# Altium PCB ESP32_EC.PcbDoc (part 2 of 2)
Units mil, origin at the board's own origin, x right, y up, seen from the top; angles counter-clockwise.
Board outline 2362.2 x 3110.24 mil, 2 copper layers (Top Layer, Bottom Layer), stack 61.756 mil thick; 57 components, 42 nets, 194 pads, 226 vias.
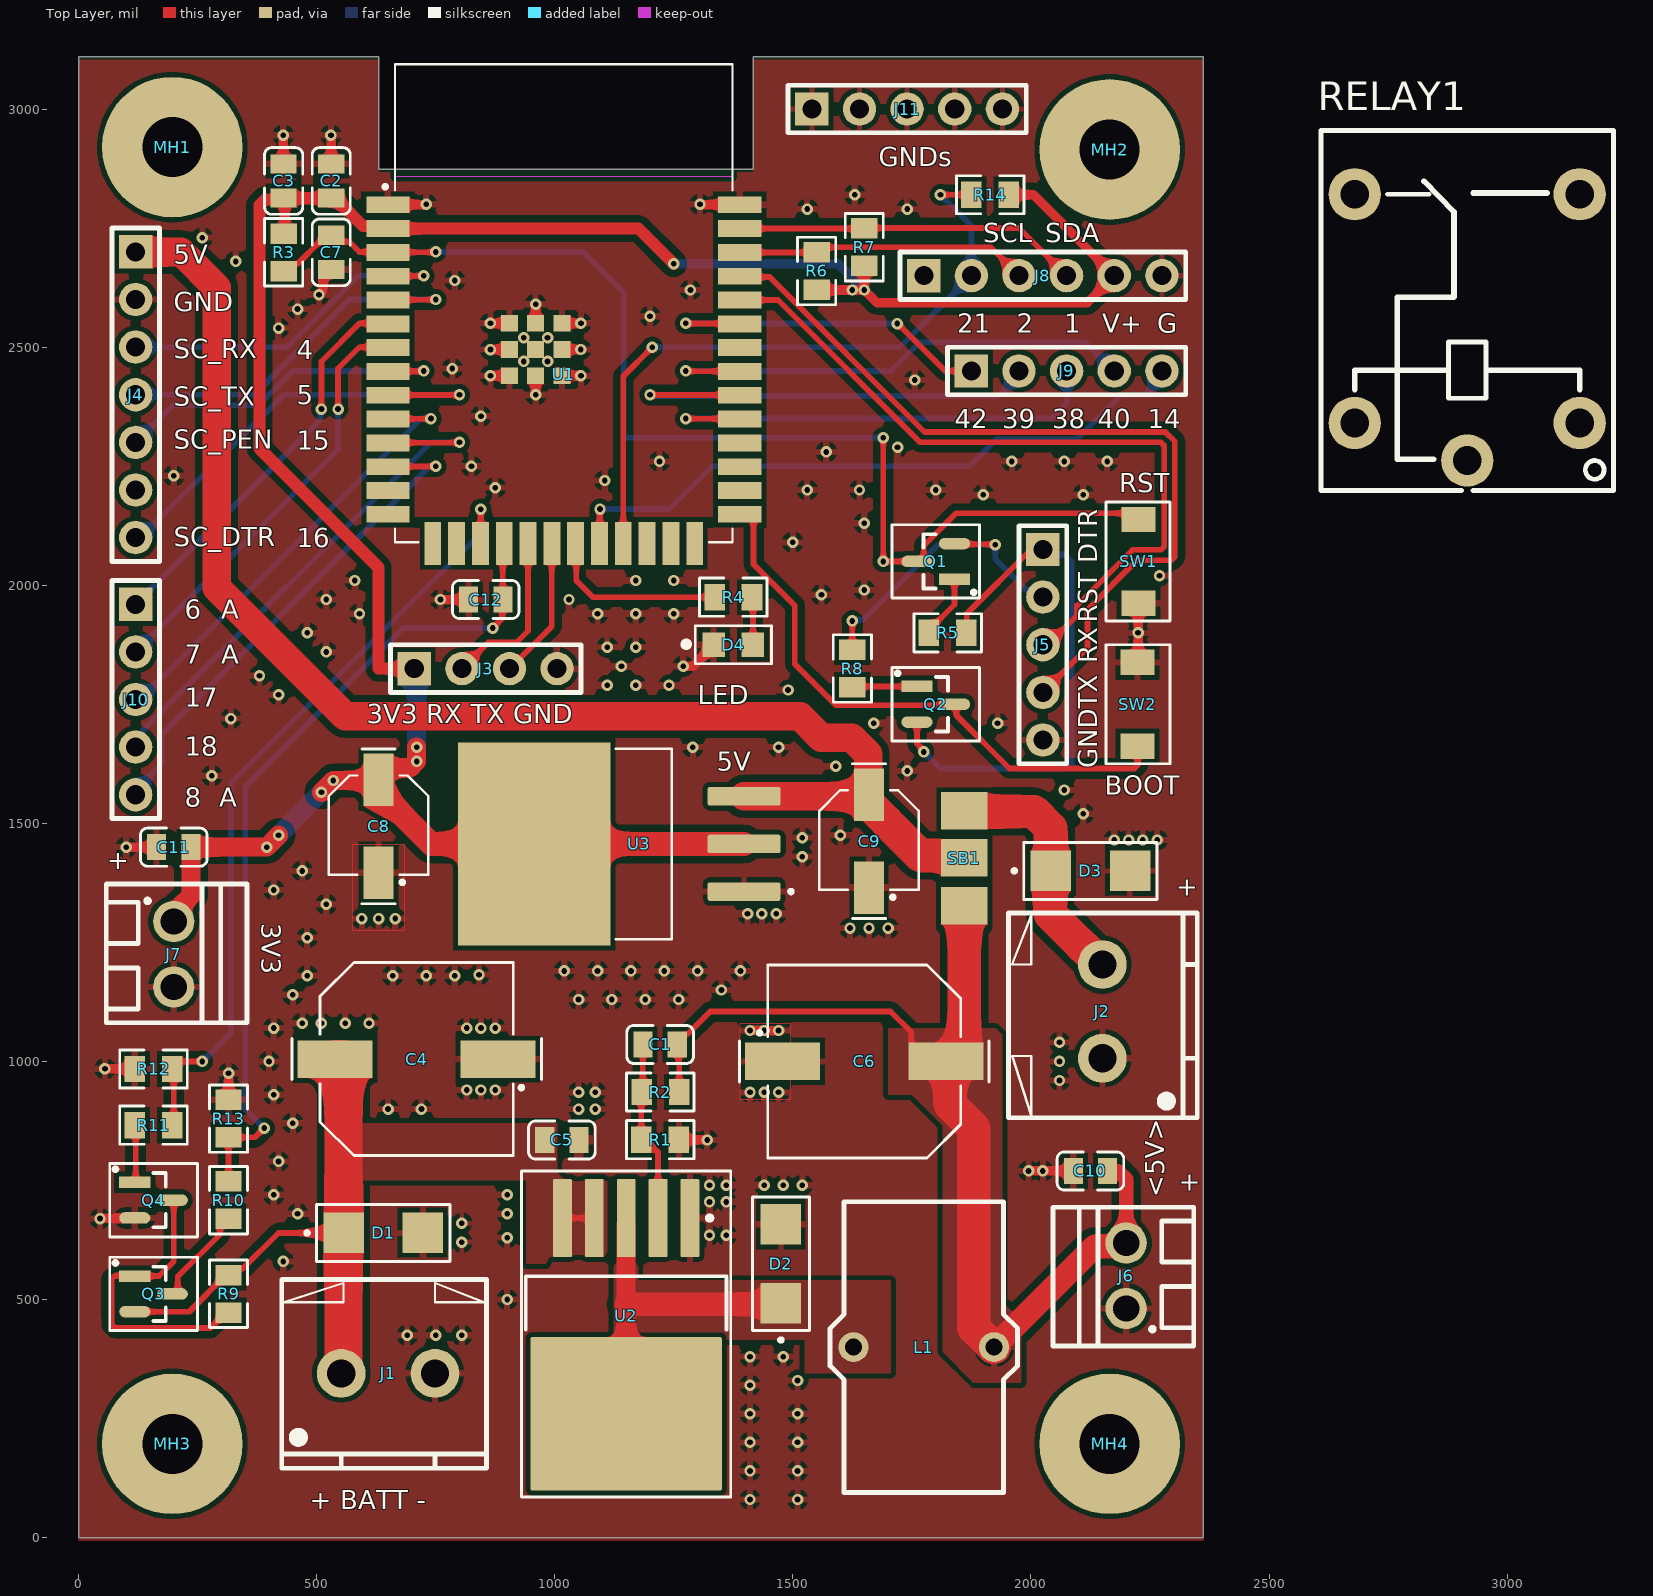
[diagram p0: Top Layer view]

## Part data (continued)
R6 R7 R14: library part RC0805FR-074K7L, "4.7 kOhms ±1% 0.125W, 1/8W Chip Resistor 0805 (2012 Metric) Moisture Resistant Thick Film", Case Code (Imperial)=0805, LCSC Part Number=C17673, Manufacturer="Yageo Group", Max Operating Temperature=155°C, Max Power Dissipation=125mW, Min Operating Temperature=-55°C, Supplier Part Number=311-4.70KCRCT-ND, Temperature Coefficient=100ppm/°C, Tolerance=1%, Voltage Rating=150V, Case/Package=0805, Category="Chip SMD Resistors", China RoHS=Non-Compliant, ComponentLink1Description=https://datasheet.octopart.com:443/RC0805FR-074K7L-Yageo-datasheet-175887523.pdf?src-supplier=IHS, ComponentLink1URL=https://datasheet.octopart.com:443/RC0805FR-074K7L-Yageo-datasheet-175887523.pdf?src-supplier=IHS, ComponentLink2Description=https://datasheet.octopart.com:443/RC0805FR-074K7L-Yageo-datasheet-103092701.pdf?src-supplier=Upverter, ComponentLink2URL=https://datasheet.octopart.com:443/RC0805FR-074K7L-Yageo-datasheet-103092701.pdf?src-supplier=Upverter, ComponentLink3Description=https://datasheet.octopart.com:443/RC0805FR-074K7L-Yageo-datasheet-98239111.pdf?src-supplier=Upverter, ComponentLink3URL=https://datasheet.octopart.com:443/RC0805FR-074K7L-Yageo-datasheet-98239111.pdf?src-supplier=Upverter, ComponentLink4Description=https://datasheet.octopart.com:443/RC0805FR-074K7L-Yageo-datasheet-45841575.pdf?src-supplier=Upverter, ComponentLink4URL=https://datasheet.octopart.com:443/RC0805FR-074K7L-Yageo-datasheet-45841575.pdf?src-supplier=Upverter, ComponentLink5Description=https://datasheet.octopart.com:443/RC0805FR-074K7L-Yageo-datasheet-8330313.pdf?src-supplier=Newark, ComponentLink5URL=https://datasheet.octopart.com:443/RC0805FR-074K7L-Yageo-datasheet-8330313.pdf?src-supplier=Newark, ComponentLink6Description=https://datasheet.octopart.com:443/RC0805FR-074K7L-Yageo-datasheet-12592811.pdf?src-supplier=element14+APAC, ComponentLink6URL=https://datasheet.octopart.com:443/RC0805FR-074K7L-Yageo-datasheet-12592811.pdf?src-supplier=element14+APAC, ComponentLink7Description=https://datasheet.octopart.com:443/RC0805FR-074K7L-Yageo-datasheet-62067350.pdf?src-supplier=element14+APAC, ComponentLink7URL=https://datasheet.octopart.com:443/RC0805FR-074K7L-Yageo-datasheet-62067350.pdf?src-supplier=element14+APAC, ComponentLink8Description=https://datasheet.octopart.com:443/RC0805FR-074K7L-Yageo-datasheet-164759695.pdf?src-supplier=Future+Electronics, ComponentLink8URL=https://datasheet.octopart.com:443/RC0805FR-074K7L-Yageo-datasheet-164759695.pdf?src-supplier=Future+Electronics, ComponentLink9Description=https://datasheet.octopart.com:443/RC0805FR-074K7L-Yageo-datasheet-8324252.pdf?src-supplier=Future+Electronics, ComponentLink9URL=https://datasheet.octopart.com:443/RC0805FR-074K7L-Yageo-datasheet-8324252.pdf?src-supplier=Future+Electronics, ComponentLink10Description=https://datasheet.octopart.com/RC0805FR-074K7L-Yageo-datasheet-73766026.pdf, ComponentLink10URL=https://datasheet.octopart.com/RC0805FR-074K7L-Yageo-datasheet-73766026.pdf, ComponentLink11Description=https://datasheet.octopart.com:443/RC0805FR-074K7L-Yageo-datasheet-13691069.pdf?src-supplier=Farnell, ComponentLink11URL=https://datasheet.octopart.com:443/RC0805FR-074K7L-Yageo-datasheet-13691069.pdf?src-supplier=Farnell, ComponentLink12Description=https://datasheet.octopart.com:443/RC0805FR-074K7L-Yageo-datasheet-118657.pdf?src-supplier=DigiKey, ComponentLink12URL=https://datasheet.octopart.com:443/RC0805FR-074K7L-Yageo-datasheet-118657.pdf?src-supplier=DigiKey, ComponentLink13Description=http://sigma.octopart.com:80/conflict_mineral_statement/Yageo-company-3.pdf?src-supplier=Compliance+Statements, ComponentLink13URL=http://sigma.octopart.com:80/conflict_mineral_statement/Yageo-company-3.pdf?src-supplier=Compliance+Statements, ComponentLink14Description=http://sigma.octopart.com:80/rohs_statement/Yageo-company-2.pdf?src-supplier=Compliance+Statements, ComponentLink14URL=http://sigma.octopart.com:80/rohs_statement/Yageo-company-2.pdf?src-supplier=Compliance+Statements, Composition="Thick Film", Depth=1.25mm, Features="Moisture Resistant", Height=500µm, Lead Free="Lead Free", Lifecycle Status=Production, Manufacturer Part Number=RC0805FR-074K7L, Military Standard=Not, Mounting Technology="Surface Mount", Number of Terminals=2, Number of Terminations=2, Packaging="Tape and Reel", Pins=2, Power Dissipation=125mW, Power Rating=125mW, Pricing="1=0.1, 10=0.03, 25=0.0224, 50=0.018, 100=0.0147, 250=0.01152, 500=0.00972, 1000=0.00829 (USD)", REACH SVHC=Yes, RoHS=Compliant, Schedule B="8533210045, 8533210045|8533210045|8533210045|8533210045|8533210045|8533210045|8533210045|8533210045|8533210045|8533210045|8533210045|8533210045|8533210045, 8533210045|8533210045|8533210045|8533210045|8533210045|8533210045|8533210045|8533210045|8533210045|8533210045|8533210045|8533210045|8533210045|8533210045, 8533210045|8533210045|8533210045|8533210045|8533210045|8533210045|8533210045|8533210045|8533210045|8533210045|8533210045|8533210045|8533210045|8533210045|8533210045", Stock=89581, Supplier=DigiKey, Termination=SMD/SMT, Voltage Rating (AC)=150V, Voltage Rating (DC)=150V, Width=1.25mm, Working Voltage=150V
R9 R10 R12: library part RC0805FR-07100KL, "100K OHM 1% 1/8W 0805", Case Code (Imperial)=0805, LCSC Part Number=C96346, Manufacturer="Yageo Group", Max Operating Temperature=155°C, Max Power Dissipation=125mW, Min Operating Temperature=-55°C, Supplier Part Number=311-100KCRCT-ND, Temperature Coefficient=100ppm/°C, Tolerance=1%, Voltage Rating=150V, Case/Package=0805, Category="Chip SMD Resistors", China RoHS=Non-Compliant, ComponentLink1Description=https://datasheet.octopart.com:443/RC0805FR-07100KL-Yageo-datasheet-175887523.pdf?src-supplier=IHS, ComponentLink1URL=https://datasheet.octopart.com:443/RC0805FR-07100KL-Yageo-datasheet-175887523.pdf?src-supplier=IHS, ComponentLink2Description=https://datasheet.octopart.com:443/RC0805FR-07100KL-Yageo-datasheet-164759695.pdf?src-supplier=Upverter, ComponentLink2URL=https://datasheet.octopart.com:443/RC0805FR-07100KL-Yageo-datasheet-164759695.pdf?src-supplier=Upverter, ComponentLink3Description=https://datasheet.octopart.com:443/RC0805FR-07100KL-Yageo-datasheet-103092701.pdf?src-supplier=Upverter, ComponentLink3URL=https://datasheet.octopart.com:443/RC0805FR-07100KL-Yageo-datasheet-103092701.pdf?src-supplier=Upverter, ComponentLink4Description=https://sigma.octopart.com:443/138820526/technical_drawing/Yageo-RC0805FR-07100KL.pdf?src-supplier=Upverter, ComponentLink4URL=https://sigma.octopart.com:443/138820526/technical_drawing/Yageo-RC0805FR-07100KL.pdf?src-supplier=Upverter, ComponentLink5Description=https://datasheet.octopart.com:443/RC0805FR-07100KL-Yageo-datasheet-118657.pdf?src-supplier=DigiKey, ComponentLink5URL=https://datasheet.octopart.com:443/RC0805FR-07100KL-Yageo-datasheet-118657.pdf?src-supplier=DigiKey, ComponentLink6Description=https://datasheet.octopart.com:443/RC0805FR-07100KL-Yageo-datasheet-8330313.pdf?src-supplier=element14+APAC, ComponentLink6URL=https://datasheet.octopart.com:443/RC0805FR-07100KL-Yageo-datasheet-8330313.pdf?src-supplier=element14+APAC, ComponentLink7Description=https://datasheet.octopart.com:443/RC0805FR-07100KL-Yageo-datasheet-12592811.pdf?src-supplier=element14+APAC, ComponentLink7URL=https://datasheet.octopart.com:443/RC0805FR-07100KL-Yageo-datasheet-12592811.pdf?src-supplier=element14+APAC, ComponentLink8Description=https://datasheet.octopart.com:443/RC0805FR-07100KL-Yageo-datasheet-62067350.pdf?src-supplier=Farnell, ComponentLink8URL=https://datasheet.octopart.com:443/RC0805FR-07100KL-Yageo-datasheet-62067350.pdf?src-supplier=Farnell, ComponentLink9Description=https://datasheet.octopart.com:443/RC0805FR-07100KL-Yageo-datasheet-13691069.pdf?src-supplier=Farnell, ComponentLink9URL=https://datasheet.octopart.com:443/RC0805FR-07100KL-Yageo-datasheet-13691069.pdf?src-supplier=Farnell, ComponentLink10Description=https://datasheet.octopart.com:443/RC0805FR-07100KL-Yageo-datasheet-127823281.pdf?src-supplier=Future+Electronics, ComponentLink10URL=https://datasheet.octopart.com:443/RC0805FR-07100KL-Yageo-datasheet-127823281.pdf?src-supplier=Future+Electronics, ComponentLink11Description=https://datasheet.octopart.com:443/RC0805FR-07100KL-Yageo-datasheet-137700087.pdf?src-supplier=Future+Electronics, ComponentLink11URL=https://datasheet.octopart.com:443/RC0805FR-07100KL-Yageo-datasheet-137700087.pdf?src-supplier=Future+Electronics, ComponentLink12Description=https://datasheet.octopart.com:443/RC0805FR-07100KL-Yageo-datasheet-77992522.pdf?src-supplier=Future+Electronics, ComponentLink12URL=https://datasheet.octopart.com:443/RC0805FR-07100KL-Yageo-datasheet-77992522.pdf?src-supplier=Future+Electronics, ComponentLink13Description=https://datasheet.octopart.com:443/RC0805FR-07100KL-Yageo-datasheet-80324437.pdf?src-supplier=Future+Electronics, ComponentLink13URL=https://datasheet.octopart.com:443/RC0805FR-07100KL-Yageo-datasheet-80324437.pdf?src-supplier=Future+Electronics, ComponentLink14Description=https://datasheet.octopart.com:443/RC0805FR-07100KL-Yageo-datasheet-67302840.pdf?src-supplier=Future+Electronics, ComponentLink14URL=https://datasheet.octopart.com:443/RC0805FR-07100KL-Yageo-datasheet-67302840.pdf?src-supplier=Future+Electronics, ComponentLink15Description=https://datasheet.octopart.com:443/RC0805FR-07100KL-Yageo-datasheet-8324252.pdf?src-supplier=Future+Electronics, ComponentLink15URL=https://datasheet.octopart.com:443/RC0805FR-07100KL-Yageo-datasheet-8324252.pdf?src-supplier=Future+Electronics, ComponentLink16Description=https://datasheet.octopart.com:443/RC0805FR-07100KL-Yageo-datasheet-79472498.pdf?src-supplier=Megastar, ComponentLink16URL=https://datasheet.octopart.com:443/RC0805FR-07100KL-Yageo-datasheet-79472498.pdf?src-supplier=Megastar, ComponentLink17Description=https://datasheet.octopart.com:443/RC0805FR-07100KL-Yageo-datasheet-27714392.pdf?src-supplier=Seeed+Studio, ComponentLink17URL=https://datasheet.octopart.com:443/RC0805FR-07100KL-Yageo-datasheet-27714392.pdf?src-supplier=Seeed+Studio, ComponentLink18Description=https://datasheet.octopart.com/RC0805FR-07100KL-Yageo-datasheet-73766026.pdf, ComponentLink18URL=https://datasheet.octopart.com/RC0805FR-07100KL-Yageo-datasheet-73766026.pdf, ComponentLink19Description=https://datasheet.octopart.com:443/RC0805FR-07100KL-Yageo-datasheet-502840.pdf?src-supplier=element14, ComponentLink19URL=https://datasheet.octopart.com:443/RC0805FR-07100KL-Yageo-datasheet-502840.pdf?src-supplier=element14, ComponentLink20Description=http://sigma.octopart.com:80/conflict_mineral_statement/Yageo-company-3.pdf?src-supplier=Compliance+Statements, ComponentLink20URL=http://sigma.octopart.com:80/conflict_mineral_statement/Yageo-company-3.pdf?src-supplier=Compliance+Statements, ComponentLink21Description=http://sigma.octopart.com:80/rohs_statement/Yageo-company-2.pdf?src-supplier=Compliance+Statements, ComponentLink21URL=http://sigma.octopart.com:80/rohs_statement/Yageo-company-2.pdf?src-supplier=Compliance+Statements, Composition="Thick Film", Depth=1.25mm, Features="Moisture Resistant", Height=500µm, Lead Free="Lead Free", Lead Pitch=400µm, Length=2mm, Lifecycle Status=Production, Manufacturer Part Number=RC0805FR-07100KL, Military Standard=Not, Mounting Technology="Surface Mount", Number of Terminals=2, Number of Terminations=2, Packaging="Tape & Reel", Pins=2, Power Dissipation=125mW, Power Rating=125mW, Pricing="1=0.1, 10=0.03, 25=0.0224, 50=0.018, 100=0.0147, 250=0.01152, 500=0.00972, 1000=0.00829 (USD)", REACH SVHC=Yes, RoHS=Compliant, Schedule B="8533210045, 8533210045|8533210045, 8533210045|8533210045|8533210045, 8533210045|8533210045|8533210045|8533210045", Stock=934885, Supplier=DigiKey, Termination=SMD/SMT, Voltage Rating (AC)=150V, Voltage Rating (DC)=150V, Width=1.25mm, Working Voltage=150V
R13: library part RC0805FR-0747KL, "RES 47K OHM 1% 1/8W 0805", Case Code (Imperial)=0805, LCSC Part Number=C105579, Manufacturer="Yageo Group", Max Operating Temperature=155°C, Min Operating Temperature=-55°C, Power Dissipation=125mW, Supplier Part Number=311-47.0KCRCT-ND, Temperature Coefficient=100ppm/°C, Tolerance=1%, Voltage Rating=150V, Case/Package=0805, Category="Chip SMD Resistors", China RoHS=Non-Compliant, ComponentLink1Description=https://datasheet.octopart.com:443/RC0805FR-0747KL-Yageo-datasheet-175887523.pdf?src-supplier=IHS, ComponentLink1URL=https://datasheet.octopart.com:443/RC0805FR-0747KL-Yageo-datasheet-175887523.pdf?src-supplier=IHS, ComponentLink2Description=https://datasheet.octopart.com:443/RC0805FR-0747KL-Yageo-datasheet-62067350.pdf?src-supplier=element14+APAC, ComponentLink2URL=https://datasheet.octopart.com:443/RC0805FR-0747KL-Yageo-datasheet-62067350.pdf?src-supplier=element14+APAC, ComponentLink3Description=https://datasheet.octopart.com:443/RC0805FR-0747KL-Yageo-datasheet-8330313.pdf?src-supplier=element14+APAC, ComponentLink3URL=https://datasheet.octopart.com:443/RC0805FR-0747KL-Yageo-datasheet-8330313.pdf?src-supplier=element14+APAC, ComponentLink4Description=https://datasheet.octopart.com:443/RC0805FR-0747KL-Yageo-datasheet-103092701.pdf?src-supplier=Upverter, ComponentLink4URL=https://datasheet.octopart.com:443/RC0805FR-0747KL-Yageo-datasheet-103092701.pdf?src-supplier=Upverter, ComponentLink5Description=https://datasheet.octopart.com:443/RC0805FR-0747KL-Yageo-datasheet-98239111.pdf?src-supplier=Upverter, ComponentLink5URL=https://datasheet.octopart.com:443/RC0805FR-0747KL-Yageo-datasheet-98239111.pdf?src-supplier=Upverter, ComponentLink6Description=https://datasheet.octopart.com:443/RC0805FR-0747KL-Yageo-Group-datasheet-176638170.pdf?src-supplier=Future+Electronics, ComponentLink6URL=https://datasheet.octopart.com:443/RC0805FR-0747KL-Yageo-Group-datasheet-176638170.pdf?src-supplier=Future+Electronics, ComponentLink7Description=https://datasheet.octopart.com:443/RC0805FR-0747KL-Yageo-datasheet-164759695.pdf?src-supplier=Future+Electronics, ComponentLink7URL=https://datasheet.octopart.com:443/RC0805FR-0747KL-Yageo-datasheet-164759695.pdf?src-supplier=Future+Electronics, ComponentLink8Description=https://datasheet.octopart.com:443/RC0805FR-0747KL-Yageo-datasheet-12592811.pdf?src-supplier=Future+Electronics, ComponentLink8URL=https://datasheet.octopart.com:443/RC0805FR-0747KL-Yageo-datasheet-12592811.pdf?src-supplier=Future+Electronics, ComponentLink9Description=https://datasheet.octopart.com:443/RC0805FR-0747KL-Yageo-datasheet-8324252.pdf?src-supplier=Future+Electronics, ComponentLink9URL=https://datasheet.octopart.com:443/RC0805FR-0747KL-Yageo-datasheet-8324252.pdf?src-supplier=Future+Electronics, ComponentLink10Description=https://datasheet.octopart.com:443/RC0805FR-0747KL-Yageo-datasheet-79472498.pdf?src-supplier=Megastar, ComponentLink10URL=https://datasheet.octopart.com:443/RC0805FR-0747KL-Yageo-datasheet-79472498.pdf?src-supplier=Megastar, ComponentLink11Description=https://datasheet.octopart.com:443/RC0805FR-0747KL-Yageo-datasheet-27714392.pdf?src-supplier=Seeed+Studio, ComponentLink11URL=https://datasheet.octopart.com:443/RC0805FR-0747KL-Yageo-datasheet-27714392.pdf?src-supplier=Seeed+Studio, ComponentLink12Description=https://datasheet.octopart.com/RC0805FR-0747KL-Yageo-datasheet-73766026.pdf, ComponentLink12URL=https://datasheet.octopart.com/RC0805FR-0747KL-Yageo-datasheet-73766026.pdf, ComponentLink13Description=https://datasheet.octopart.com:443/RC0805FR-0747KL-Yageo-datasheet-13691069.pdf?src-supplier=Farnell, ComponentLink13URL=https://datasheet.octopart.com:443/RC0805FR-0747KL-Yageo-datasheet-13691069.pdf?src-supplier=Farnell, ComponentLink14Description=https://datasheet.octopart.com:443/RC0805FR-0747KL-Yageo-datasheet-118657.pdf?src-supplier=DigiKey, ComponentLink14URL=https://datasheet.octopart.com:443/RC0805FR-0747KL-Yageo-datasheet-118657.pdf?src-supplier=DigiKey, ComponentLink15Description=https://datasheet.octopart.com:443/RC0805FR-0747KL-Yageo-datasheet-502840.pdf?src-supplier=element14, ComponentLink15URL=https://datasheet.octopart.com:443/RC0805FR-0747KL-Yageo-datasheet-502840.pdf?src-supplier=element14, ComponentLink16Description=http://sigma.octopart.com:80/conflict_mineral_statement/Yageo-company-3.pdf?src-supplier=Compliance+Statements, ComponentLink16URL=http://sigma.octopart.com:80/conflict_mineral_statement/Yageo-company-3.pdf?src-supplier=Compliance+Statements, ComponentLink17Description=http://sigma.octopart.com:80/rohs_statement/Yageo-company-2.pdf?src-supplier=Compliance+Statements, ComponentLink17URL=http://sigma.octopart.com:80/rohs_statement/Yageo-company-2.pdf?src-supplier=Compliance+Statements, Composition="Thick Film", Contact Plating=Tin, Depth=1.25mm, Height=500µm, Lead Free="Lead Free", Length=2mm, Lifecycle Status=Production, Manufacturer Part Number=RC0805FR-0747KL, Mounting Technology="Surface Mount", Number of Terminals=2, Number of Terminations=2, Packaging="Tape and Reel", Pins=2, Power Rating=125mW, Pricing="1=0.1, 10=0.009, 25=0.0088, 50=0.0082, 100=0.0071 (USD)", Radiation Hardening=No, REACH SVHC=Yes, RoHS=Compliant, Schedule B="8533210045, 8533210045|8533210045, 8533210045|8533210045|8533210045, 8533210045|8533210045|8533210045|8533210045", Stock=191777, Supplier=DigiKey, Termination=SMD/SMT, Voltage Rating (AC)=150V, Voltage Rating (DC)=150V, Width=1.25mm, Working Voltage=150V
RELAY1: "12V_Relay"
SW1 SW2: library part TS-1088-AR02016, "Without 50mA 4mm 100MΩ 100000 Times 12V 160gf 3mm 2mm Round Button Standing paste SPST SMD Tactile Switches ROHS", LCSC Part Number=C720477
U2: library part XL4005E1, "XL4005E1-5V-5A-BUCK / 300KHz", Package=TO-263-5L
U3: "IC REG LINEAR 3.3V 5A TO263", Case/Package=TO-263, Current Rating=5A, Dropout Voltage=1.3V, Manufacturer="Texas Instruments", Manufacturer Lifecycle Status=ACTIVE, Max Operating Temperature=125°C, Max Power Dissipation=30W, Max Supply Voltage=27V, Min Current Limit=5.5A, Min Input Voltage=2.6V, Min Operating Temperature=-40°C, Nominal Output Voltage=3.3V, Quiescent Current=10mA, Category="LDO Voltage Regulators", ComponentLink1Description=https://datasheet.octopart.com:443/LM1084IS-3.3-NOPB-Texas-Instruments-datasheet-36834603.pdf?src-supplier=Farnell, ComponentLink1URL=https://datasheet.octopart.com:443/LM1084IS-3.3-NOPB-Texas-Instruments-datasheet-36834603.pdf?src-supplier=Farnell, ComponentLink2Description=https://octopart.com:443/opatz8j6/c1?t=w6vwqWfNppgvDygbXveTbClDM0ZnxyhdCHGzur0Nm6VEadmthkQzndR7s3Ajz8MLEFRhQ3UDka_f8COcniNFxrzJWTGIO3bk5hs1S7SsHSpYp2xDlcf4aJYdkGqn7GyG9QFfRscTRC8MpRePZIQmcWcJsyAVqzxwKd2qe9HT6rqpAEiSzx3lhvhiiMLhKmG65SlrnGiZ_vRKX3RdqzDDq8IML42iScMdYb8bI4AVealvVNZHUd0B-HvSGOc2NH6MwpAeGLWrFv1pDJgD9Da9zcNFi_yt1wulgeQkiDTOtaJ6DfIQVm6L8XiNZEVLJe4lirfj9lBNRZZMY79DqDQz1ZUurfLBoxnm0SzQwy_iUXY3z08JEKkfSBOK9XhfN4xy4gbj&src-supplier=Texas+Instruments, ComponentLink2URL=https://octopart.com:443/opatz8j6/c1?t=w6vwqWfNppgvDygbXveTbClDM0ZnxyhdCHGzur0Nm6VEadmthkQzndR7s3Ajz8MLEFRhQ3UDka_f8COcniNFxrzJWTGIO3bk5hs1S7SsHSpYp2xDlcf4aJYdkGqn7GyG9QFfRscTRC8MpRePZIQmcWcJsyAVqzxwKd2qe9HT6rqpAEiSzx3lhvhiiMLhKmG65SlrnGiZ_vRKX3RdqzDDq8IML42iScMdYb8bI4AVealvVNZHUd0B-HvSGOc2NH6MwpAeGLWrFv1pDJgD9Da9zcNFi_yt1wulgeQkiDTOtaJ6DfIQVm6L8XiNZEVLJe4lirfj9lBNRZZMY79DqDQz1ZUurfLBoxnm0SzQwy_iUXY3z08JEKkfSBOK9XhfN4xy4gbj&src-supplier=Texas+Instruments, ComponentLink3Description=https://sigma.octopart.com:443/49251900/technical_drawing/Texas-Instruments-LM1084IS-3.3-NOPB.pdf?src-supplier=Texas+Instruments, ComponentLink3URL=https://sigma.octopart.com:443/49251900/technical_drawing/Texas-Instruments-LM1084IS-3.3-NOPB.pdf?src-supplier=Texas+Instruments, ComponentLink4Description=https://datasheet.octopart.com:443/LM1084IS-3.3-NOPB-Texas-Instruments-datasheet-14446412.pdf?src-supplier=Texas+Instruments, ComponentLink4URL=https://datasheet.octopart.com:443/LM1084IS-3.3-NOPB-Texas-Instruments-datasheet-14446412.pdf?src-supplier=Texas+Instruments, ComponentLink5Description=https://datasheet.octopart.com:443/LM1084IS-3.3/NOPB-Texas-Instruments-datasheet-10621405.pdf?src-supplier=element14, ComponentLink5URL=https://datasheet.octopart.com:443/LM1084IS-3.3/NOPB-Texas-Instruments-datasheet-10621405.pdf?src-supplier=element14, ComponentLink6Description=https://datasheet.octopart.com:443/LM1084IS-3.3/NOPB-National-Semiconductor-datasheet-659.pdf?src-supplier=element14, ComponentLink6URL=https://datasheet.octopart.com:443/LM1084IS-3.3/NOPB-National-Semiconductor-datasheet-659.pdf?src-supplier=element14, ComponentLink7Description=https://datasheet.octopart.com:443/LM1084IS-3.3-NOPB-Texas-Instruments-datasheet-163658313.pdf?src-supplier=Augswan, ComponentLink7URL=https://datasheet.octopart.com:443/LM1084IS-3.3-NOPB-Texas-Instruments-datasheet-163658313.pdf?src-supplier=Augswan, ComponentLink8Description=https://datasheet.octopart.com:443/LM1084IS-3.3-NOPB-Texas-Instruments-datasheet-21076641.pdf?src-supplier=Newark, ComponentLink8URL=https://datasheet.octopart.com:443/LM1084IS-3.3-NOPB-Texas-Instruments-datasheet-21076641.pdf?src-supplier=Newark, ComponentLink9Description=https://datasheet.octopart.com:443/LM1084IS-3.3-NOPB-Texas-Instruments-datasheet-7825620.pdf?src-supplier=Jameco, ComponentLink9URL=https://datasheet.octopart.com:443/LM1084IS-3.3-NOPB-Texas-Instruments-datasheet-7825620.pdf?src-supplier=Jameco, ComponentLink10Description=http://sigma.octopart.com:80/reach_statement/Texas-Instruments-company-64.pdf?src-supplier=Compliance+Statements, ComponentLink10URL=http://sigma.octopart.com:80/reach_statement/Texas-Instruments-company-64.pdf?src-supplier=Compliance+Statements, ComponentLink11Description=http://sigma.octopart.com:80/conflict_mineral_statement/Texas-Instruments-company-63.pdf?src-supplier=Compliance+Statements, ComponentLink11URL=http://sigma.octopart.com:80/conflict_mineral_statement/Texas-Instruments-company-63.pdf?src-supplier=Compliance+Statements, Height=4.83mm, Lead Free="Contains Lead", Length=10.18mm, Lifecycle Status=Production, Manufacturer Part Number=LM1084IS-3.3/NOPB, Max Output current=5A, Mounting Technology="Surface Mount", Number of Channels=1, Number of Outputs=1, Number of Regulators=1, Output Current=5A, Output Type=Fixed, Output Voltage=3.3V, Pins=3, Polarity=Positive, Power Dissipation=30W, Pricing="1=3.325, 10=2.486, 25=2.204 (USD)", Radiation Hardening=No, REACH SVHC=No, RoHS=Compliant, Schedule B="8542390000, 8542390000|8542390000|8542390000|8542390000|8542390000|8542390000|8542390000|8542390000|8542390000|8542390000|8542390000|8542390000|8542390000|8542390000|8542390000|8542390000|8542390000|8542390000|8542390000|8542390000|8542390000|8542390000|8542390000|85", Stock=85, Supplier="Arrow Electronics", Supplier Part Number=LM1084IS-3.3/NOPB, Thickness=4.44mm, Weight=113.398093g, Width=8.41mm

## Via types
v1: diameter 24, hole 12, Top Layer to Bottom Layer, tented both sides, 226 vias

## Nets (pads, with @x,y where several pads share a name; then routed paths per layer and width w, separated by ;. In a path a pad name is that pad's centre, name@x,y a point inside that pad or via, vN(x,y) a via of type N, cw(c..) or ccw(c..) an arc to the next point about the centre after c; other vN are vias at no path point)
3V3: C2.2 C3.1 C8.1 C11.1 J3.1 J7.1 J8.5 R3.2 R6.2 R7.2 R14.2 U1.2 U3.2 U3.4 | length 5512.4
  Top Layer w20: J7.1 J7.1@200,1311.92 ; R3.2 433.07,2740.7 C3.1@433.07,2810.56 ; C8.1@628.86,1590 C8.1 ; C8.1@635,1562.36 C8.1@635,1590 ; C8.1@651.42,1606.42 C8.1@635,1590 ; C8.1@651.42,1630 629.92,1608.5 629.92,1604.73 C8.1 ; R6.2@1550.63,2620 v1(1625,2620) v1(1650,2620) ; R7.2 v1(1650,2620) ; R14.2 2005,2820 J8.5 2118.19,2593.19 1676.81,2593.19 v1(1650,2620) ; C8.1 633.94,1591.06 C8.1@635,1590
  Top Layer w25: C3.1@433.07,2810.56 C3.1 ; C2.2 C3.1 ; C2.2@546.97,2804.95 597.77,2754.15 644.23,2754.15 U1.2 1176.06,2748.94 v1(1250,2675) ; J3.1 704.78,1825 629.92,1825 629.92,2037.27 380,2287.19 380,2798.28 391.72,2810 427.74,2810 C3.1
  Top Layer w40: J7.1@200,1311.92 236,1347.92 C11.1 v1(395,1450) v1(420,1475) ; v1(510,1565) v1(535,1590) C8.1@628.86,1590 ; C8.1@629.92,1604.73 641.42,1616.23 696.23,1616.23 v1(710,1630) v1(710,1660)
  Top Layer w50: C8.1@635,1562.36 740.67,1456.69 U3.4 U3.2
  Bottom Layer w20: J3.1 705.22,1824.78 J3.1@710,1820 ; v1(1250,2675) 1595,2675 v1(1650,2620) v1(1625,2620)
  Bottom Layer w40: v1@395.77,1450.77 v1(420,1475) v1(510,1565) v1(535,1590) ; v1(710,1630) v1(710,1660) J3.1@710,1820
5V_BUCK: C1.1 C6.1 C10.1 J6.2 L1.2 R2.2 SB1.2 | length 2313
  Top Layer w12: R2.2 1261.26,993.74 1260,995 1260,1032.89 C1.1 1257.26,1043.13 1271.26,1057.13 1278.76,1057.13 1326.63,1105 1705,1105 1748.52,1061.48 1748.52,1033.37 1781.89,1000 C6.1
  Top Layer w30: C10.1 2163.07,772.07 2165.15,770 2182.43,770 2200,752.43 J6.2
  Top Layer w50: L1.2 2134.53,611.89 2192.99,611.89 J6.2
  Top Layer w70: C6.1 C6.1@1825.63,1000 ; SB1.2 1860,1004.37 1855.63,1000 C6.1@1825.63,1000 ; L1.2 1921.01,400 1880,441.01 1880,860 1830,910 1830,995.63 C6.1@1825.63,1000
5V_EXT: D3.2 J2.2 SB1.1 | length 530.2
  Top Layer w70: SB1.1@1860,1524.21 SB1.1@1879.21,1524.21 ; SB1.1@1880,1525 2006.59,1525 2041.73,1489.85 D3.2 2040,1398.27 2040,1310 2146.57,1203.43 J2.2
5V_IN: C9.1 J4.1 SB1.3 U3.3 | length 2913.2
  Top Layer w60: J4.1 215,2700 290,2625 290,1995 560,1725 1515,1725 1560,1680 1623.36,1680 1658.5,1644.85 1658.5,1561.5 C9.1 ; U3.3 C9.1@1634.88,1556.69
  Top Layer w70: C9.1@1660.73,1539.88 1697,1503.61 1697,1503 1767.48,1432.52 1855.63,1432.52 SB1.3
BAT_ADC: C12.2 R10.2 R13.2 U1.18 | length 1755.4
  Top Layer w12: R10.2 R13.2 370.63,840.63 v1(390,860) ; v1(870,1910) 890,1930 890,1969 C12.2 891,2084.82 U1.18
  Bottom Layer w12: v1(390,860) 350,900 350,1577.97 682.03,1910 v1(870,1910)
BAT_ADC_EN: R11.1 R12.2 U1.17 | length 1668.7
  Top Layer w12: R11.1 200,869.29 200,981.1 R12.2 204.25,984.25 210,990 210,997.5 212.5,1000 v1(260,1000) ; U1.17 844.47,2088.29 v1(844.47,2159.47)
  Bottom Layer w12: v1(260,1000) 320,1060 320,1585 845,2110 845,2158.94 v1(844.47,2159.47)
BTN_GPIO0: Q2.3 SW2.2 U1.27 | length 1239
  Top Layer w12: U1.27 1405.61,2148.94 1417.32,2137.22 1417.32,2043.89 1504.07,1957.14 1504.07,1834.72 1590.81,1747.98 1837.37,1747.98 Q2.3 1843.02,1746.37 1843.02,1726.98 1955,1615 2216.97,1615 2224,1622.03 SW2.2
DEBUG_LED: R4.2 U1.21 | length 404.9
  Top Layer w12: U1.21 1043.94,2093.94 U1.21@1045,2095 ; U1.21@1050,2100 U1.21@1045,2095 ; R4.2 1080,1975 1045,2010 U1.21@1045,2095
DTR: J5.1 Q2.2 R5.1 | length 1163.4
  Top Layer w12: Q2.2@1750,1707.01 1755.59,1712.6 Q2.2 1760.61,1667.64 1775,1653.25 v1(1775,1650) ; R5.1 1865.24,1900.87 1865.24,1940.24 2000,2075 J5.1
  Bottom Layer w12: v1(1775,1650) 1810,1615 2077.97,1615 2085,1622.03 2085,2050 2070.97,2064.03 2035.97,2064.03 J5.1
EN: C7.2 Q1.3 R3.1 SW1.2 U1.3 | length 2501.5
  Top Layer w12: R3.1 446.34,2675.23 460.23,2675.23 505.94,2720.94 516.69,2720.94 C7.2 544.69,2720.94 569.06,2720.94 590,2700 648.39,2700 U1.3 649.98,2699.47 749.47,2699.47 v1(750,2700) ; v1(1690,2310) v1(1690,2050) Q1.3 1769.59,2050 1775.18,2055.59 1775.18,2083.43 1842.75,2151 2213,2151 SW1.2
  Bottom Layer w12: v1(750,2700) 1060,2700 1145,2615 1145,2317.03 1152.03,2310 v1(1690,2310)
FB: C1.2 R1.2 R2.1 U2.2 | length 395.5
  Top Layer w12: C1.2@1185.26,1050.63 C1.2 1185.26,1000.26 1185,1000 1185,953.11 1181.89,950 1181.89,844.72 1216.93,809.68 U2.2
GND: C2.1 C3.2 C4.2 C5.1 C6.2 C7.1 C8.2 C9.2 C10.2 C11.2 C12.1 D1.1 D2.1 D3.1 D4.2 J1.2 J2.1 J3.4 J4.2 J5.5 J6.1 J7.2 J8.6 J11.1 J11.2 J11.3 J11.4 J11.5 Q4.2 R1.1 R12.1 R13.1 SW1.1 SW2.1 U1.GND U2.1 U3.1 | length 1412.4
  Top Layer w12: U1.GND@649.45,2798.94 U1.GND@649.98,2799.47 ; SW1.1@2225,1960 2226,1961 SW1.1
  Top Layer w20: v1(45,670) 45.63,670.63 117.46,670.63 Q4.2 ; v1(55.37,984.63) 117.74,984.63 R12.1 ; v1(100,1450) C11.2 ; R13.1@310,924.33 R13.1 315,919.41 v1(315,975) ; v1(430,2945) 430,2885 430.06,2884.94 C3.2 ; v1(505,2610) 505,2611.08 513.19,2619.27 513.19,2652.94 523.19,2662.94 C7.1 ; v1(530,2945) 530.34,2944.66 530.34,2885.29 C2.1 ; U1.GND@649.98,2799.47 729.47,2799.47 v1(730,2800) ; v1(760,1970) C12.1 ; v1(864.94,2439.82) 865,2439.88 904.76,2439.88 U1.GND@904.82,2439.94 ; v1(864.94,2494.94) 865,2495 904.76,2495 U1.GND@904.82,2495.06 ; v1(865,2550) 865.06,2550.06 U1.GND@904.82,2550.06 ; C4.2 C4.2@885,1005 ; v1(959.82,2589.94) 959.88,2589.88 959.88,2550.12 U1.GND@959.94,2550.06 ; U1.GND@959.88,2439.88 959.94,2439.82 959.94,2400.06 v1(960,2400) ; U1.GND@1014.94,2494.94 1015,2495 1054.76,2495 v1(1054.82,2495.06) ; U1.GND@1015,2439.88 1015.06,2439.94 1054.94,2439.94 v1(1055,2440) ; U1.GND@1015,2550.12 1015.06,2550.06 1054.94,2550.06 v1(1055,2550) ; R1.1@1260,835 R1.1@1260.32,835.31 ; R1.1 R1.1@1260.32,835.31 ; v1(1270,1830) 1290.63,1830 1335,1874.37 1335,1875 D4.2 ; v1(1305,2800) 1305.53,2799.47 1387.89,2799.47 U1.GND@1388.43,2798.94 ; v1(1320,835) 1319.68,835.31 R1.1@1260.32,835.31 ; v1@1416.23,1065.77 1439.23,1065.77 v1(1440,1065) 1440.77,1064.23 v1@1463.77,1064.23 ; v1(1995,770) v1(2025,770) C10.2 ; SW2.1 2225,1839 v1(2225,1900) SW1.1@2225,1960
  other v1: 1410,80 1510,80 1410,140 1510,140 1410,200 1510,200 1410,260 1510,260 1410,320 1510,330 1410,380 1480,380 690,425 750,425 805,425 900,500 430,580 805,620 900,630 1325,635 1360,635 805,660 460,680 900,680 1325,705 1360,705 410,720 900,720 1325,740 1360,740 1440,740 1480,740 1520,740 420,790 450,870 650,900 720,900 1050,900 1085,900 410,930 1050,935 1085,935 1410,935 1440,935 1470,935 815,940 845,940 875,940 2060,960 400,1000 2060,1000 2060,1040 1410,1065 1470,1065 410,1070 815,1070 845,1070 875,1070 470,1080 510,1080 560,1080 610,1080 1050,1130 1120,1130 1190,1130 1260,1130 450,1140 1350,1150 480,1180 660,1180 730,1180 790,1180 841,1182.25 1020,1190 1090,1190 1160,1190 1230,1190 1300,1190 1390,1190 480,1260 1620,1280 1660,1280 1700,1280 595,1300 630,1300 665,1300 1405,1310 1435,1310 1465,1310 520,1330 410,1360 470,1400 1520,1430 2175,1465 2205,1465 2235,1465 2265,1465 1520,1470 1600,1475 2110,1520 2070,1570 280,1600 1740,1610 1590,1620 1290,1660 1470,1660 1670,1710 1930,1710 320,1720 420,1770 1490,1780 1110,1790 1170,1790 1240,1790 380,1810 1140,1830 520,1860 1110,1870 1170,1870 480,1900 590,1940 1090,1940 1170,1940 1250,1940 520,1970 1030,1970 1560,1980 1650,1990 580,2010 1170,2010 1250,2010 2270,2020 1500,2090 1650,2130 1900,2190 2110,2190 1530,2200 1640,2200 1800,2200 875,2205 1105,2220 200,2230 825,2250 1220,2260 1960,2260 2070,2260 2160,2260 1570,2280 1720,2290 845,2355 1756,2431 785,2455 935,2470 985,2470 935,2520 985,2520 420,2540 1200,2565 460,2580 1285,2620 790,2640 330,2680 260,2730 1530,2790 1740,2790 1630,2820
NetD4_1: D4.1 R4.1 | length 100.8
  Top Layer w12: R4.1 1416.34,1973.03 D4.1
NetQ1_1: Q1.1 R5.2 | length 134.9
  Top Layer w12: R5.2 1785.63,1905.91 1839.39,1959.67 Q1.1
NetQ2_1: Q2.1 R8.2 | length 136.3
  Top Layer w12: R8.2 1626.77,1787.4 Q2.1
NetQ3_1: Q3.1 Q4.3 R9.1 | length 637.7
  Top Layer w12: Q4.3 200,705.53 200,580 169.21,549.21 Q3.1 115.53,549.21 111,544.68 105.67,550 76.5,550 69.47,542.97 69.47,462.79 70,462.26 70,447.03 77.03,440 276.61,440 309.06,472.44 R9.1
NetQ3_3: Q3.3 R10.1 | length 211.4
  Top Layer w12: Q3.3 202.86,511.81 208.45,517.4 208.45,548.45 296.79,636.79 296.79,653.64 312.45,669.29 R10.1
NetQ4_1: Q4.1 R11.2 | length 121.7
  Top Layer w12: Q4.1 120,747.97 120,864.25 R11.2
RTC_SCL: J8.3 R6.1 U1.38 | length 627.7
  Top Layer w12: U1.38 1388.43,2691.57 1390,2690 1398.94,2698.94 1547.23,2698.94 1558.29,2710 1915,2710 J8.3
RTC_SDA: J8.4 R7.1 U1.39 | length 727.6
  Top Layer w12: U1.39 R7.1@1649.57,2748.94 ; R7.1@1650,2750 1975,2750 J8.4
RTC_SQW: J8.2 R14.1 U1.23 | length 1437.8
  Top Layer w12: U1.23 1143.94,2438.94 v1(1205,2500) ; v1(1810,2820) R14.1
  Bottom Layer w12: v1(1205,2500) 1725,2500 J8.2@1873.75,2648.75 ; v1(1810,2820) 1875,2755 J8.2 ; J8.2@1875,2645 J8.2@1875,2648.75 ; J8.2@1873.75,2648.75 J8.2@1875,2648.75 ; J8.2@1873.75,2648.75 J8.2 ; J8.2@1875,2648.75 J8.2
RTS: J5.2 Q1.2 R8.1 | length 692.5
  Top Layer w12: R8.1 v1(1625,1925) ; Q1.2 1840.59,2086.2 1923.8,2086.2 v1(1925,2085) ; Q1.2@1844.41,2087.4 1850,2092.99 Q1.2@1855.59,2087.4
  Bottom Layer w12: v1(1625,1925) 1627.3,1927.3 1647.3,1927.3 1805,2085 v1(1925,2085) 1925,2055 1989.52,1990.48 1993.83,1990.48 2009.31,1975 J5.2
RX_0: J5.3 U1.36 | length 1582.8
  Top Layer w12: U1.36 1468.74,2598.94 1767.68,2300 2272.97,2300 2280,2292.97 2280,2081.3 2272.97,2074.27 2213.16,2074.27 2096.64,1957.75 2096.64,1936.64 2035,1875 J5.3
RX_SP3485: J3.2 U1.19 | length 369.5
  Top Layer w12: U1.19 943.94,1903.94 920,1880 860.22,1880 J3.2 ; J3.2 800.22,1820 800,1820 804.78,1824.78 J3.2
SIMCOM_DTR: J4.7 U1.9 | length 955.3
  Top Layer w12: U1.9 649.98,2399.47 799.47,2399.47 v1(800,2400)
  Bottom Layer w12: J4.7 130,2100 386,2356 387.11,2356 431.11,2400 v1(800,2400)
SIMCOM_PEN: J4.5 U1.8 | length 745.2
  Top Layer w12: U1.8@650.16,2449.33 650.3,2449.47 724.47,2449.47 v1(725,2450)
  Bottom Layer w12: J4.5 120,2305 125,2305 198,2378 378,2378 450,2450 v1(725,2450)
SIMCOM_RX: J4.3 U1.4 | length 743.1
  Top Layer w12: U1.4 649.98,2649.47 724.47,2649.47 v1(725,2650)
  Bottom Layer w12: J4.3 437.77,2500 587.77,2650 v1(725,2650)
SIMCOM_TX: J4.4 U1.5 | length 813.8
  Top Layer w12: U1.5 649.98,2599.47 749.47,2599.47 v1(750,2600)
  Bottom Layer w12: J4.4 368.89,2400 568.89,2600 v1(750,2600)
SPARE_1: J10.1 U1.6 | length 845.3
  Top Layer w12: v1(510,2370) 510,2470 590,2550 648.39,2550 U1.6 U1.6@649.98,2549.47
  Bottom Layer w12: J10.1 507.7,2347.7 507.7,2367.7 v1(510,2370)
SPARE_2: J10.2 U1.7 | length 895.3
  Top Layer w12: v1(545,2370) 545,2455 590,2500 648.39,2500 U1.7 U1.7@649.98,2499.47
  Bottom Layer w12: J10.2 545,2285 v1(545,2370)
SPARE_3: J10.3 U1.10 | length 954.5
  Top Layer w12: U1.10@650.16,2349.33 739.33,2349.33 v1(740,2350)
  Bottom Layer w12: J10.3 129.31,1760 719.31,2350 v1(740,2350)
SPARE_4: J10.4 U1.11 | length 1102
  Top Layer w12: U1.11@655.01,2299.47 799.47,2299.47 v1(800,2300)
  Bottom Layer w12: J10.4 120,1675.69 135.48,1691.17 135.48,1695.48 740,2300 v1(800,2300)
SPARE_5: J10.5 U1.12 | length 1058.4
  Top Layer w12: U1.12@650.16,2249.33 650.3,2249.47 749.47,2249.47 v1(750,2250)
  Bottom Layer w12: J10.5 120,1570 175,1625 175,1687.46 735.25,2247.7 747.7,2247.7 v1(750,2250)
SPARE_6: J9.5 U1.22 | length 1401.7
  Top Layer w12: U1.22@1095,2067.64 1094.47,2068.17 1094.47,2159.47 v1(1095,2160)
  Bottom Layer w12: v1(1095,2160) 1240,2160 1330,2250 1871.11,2250 1927.11,2306 2096,2306 2189,2399 2239,2399 2275,2435 J9.5
SPARE_7: J9.4 U1.33 | length 1066.5
  Top Layer w12: v1(1275,2450) 1275.53,2449.47 1387.89,2449.47 U1.33
  Bottom Layer w12: v1(1275,2450) 1706.11,2450 1766.11,2510 2115,2510 2165,2460 2165,2455 2170,2450 J9.4
SPARE_8: J9.3 U1.31 | length 995.6
  Top Layer w12: v1(1275,2350) 1275.53,2349.47 1387.89,2349.47 U1.31
  Bottom Layer w12: v1(1275,2350) 2043.89,2350 2075,2381.11 J9.3
SPARE_9: J9.2 U1.32 | length 992
  Top Layer w12: v1(1200,2400) 1200.53,2399.47 U1.32@1387.89,2399.47
  Bottom Layer w12: v1(1200,2400) 1202.3,2397.7 1210.78,2397.7 1211.3,2397.19 1932.19,2397.19 1975,2440 J9.2
SPARE_10: J9.1 U1.35 | length 755.7
  Top Layer w12: v1(1275,2550) 1275.53,2549.47 1387.89,2549.47 U1.35 ; v1(1719.47,2549.47) 1720,2550 1820,2450 J9.1
  Bottom Layer w12: v1(1275,2550) 1275.27,2549.73 1719.2,2549.73 v1(1719.47,2549.47)
Switch: D2.2 L1.1 U2.3 U2.6 | length 738.1
  Top Layer w12: U2.3@1150,657.87 1151.57,659.45 1150,661.02 U2.3 ; D2.2@1470,490 1471.73,491.73 D2.2
  Top Layer w40: U2.6 1150,490 U2.3@1150,657.87
  Top Layer w50: 1150,490 D2.2@1470,490
TX_0: J5.4 U1.37 | length 1742.9
  Top Layer w12: U1.37 1388.94,2648.94 1390,2650 1392.91,2647.09 1451.7,2647.09 1776.79,2322 2282.08,2322 2302.27,2301.81 2302.27,2059.3 2295.25,2052.27 2222.27,2052.27 2118.64,1948.64 2118.64,1868.64 J5.4
TX_SP3485: J3.3 U1.20 | length 299.8
  Top Layer w12: J3.3 993.94,1913.72 U1.20
"Vbat (8.4V max)": C4.1 C5.2 D1.2 J1.1 Q3.2 R9.2 U2.4 U2.5 | length 1341.1
  Top Layer w12: Q3.2 232.28,474.41 309.06,551.18 R9.2 328.78,565 345,565 419.76,639.76 D1.2 ; U2.5@1016.14,733.07 U2.5 U2.4 1083.07,691.93 U2.4@1075,700
  Top Layer w80: C4.1 555.87,1005 556.5,1004.37 D1.2 556.5,365.73 555.85,365.09 555.85,350.56 J1.1@556.5,349.92
pads on no net: J4.6 J8.1 MH1.1 MH2.1 MH3.1 MH4.1 RELAY1.1 RELAY1.2 RELAY1.3 RELAY1.4 RELAY1.5 U1.13 U1.14 U1.15 U1.16 U1.24 U1.25 U1.26 U1.28 U1.29 U1.30 U1.34

## Polygon pours and split planes (outlines as drawn)
GND on Top Layer "GND_L01_P026" (solid, remove dead copper, pour order 26): 0,3103.24 629.92,3103.24 629.92,2867.02 1417.32,2867.02 1417.32,3103.24 2362.2,3103.24 2362.2,-7 0,-7
Switch on Top Layer "Top Layer-Switch" (solid, pour order 7): 1123.65,415 1446.73,415 1525,415 1525,345 1706,345 1706,540 1175,540 1175,760 1125,760 1123.65,759.42
GND on Top Layer "GND_L01_P023" (solid, pour order 23): 1030,955 1105,955 1105,785 1030,785
GND on Top Layer "GND_L01_P022" (solid, pour order 22): 2145,1490 2290,1490 2290,1335 2145,1335
5V_BUCK on Top Layer "5V_BUCK_L01_P011" (solid, pour order 11): 1700,1070 1925,1070 1940,1055 1940,495 1960,475 1970,475 1980,465 1980,325 1880,325 1815,390 1815,865 1750,930 1700,930
GND on Top Layer "GND_L01_P020" (solid, pour order 20): 1275,1385 1590,1385 1590,1435 1725,1435 1725,1265 1590,1265 1590,1295 1275,1295
GND on Top Layer "GND_L01_P021" (solid, pour order 21): 575,1455 575,1275 685,1275 685,1455
GND on Top Layer "GND_L01_P018" (solid, pour order 18): 1390,1080 1495,1080 1495,920 1390,920
"Vbat (8.4V max)" on Top Layer "Top Layer-VIN" (solid, pour order 16): 940,575 1110,575 1110,769.21 1005,769.21 1005,870 520,870 520,750 940,750 940,700
GND on Top Layer "GND_L01_P014" (solid, pour order 14): 795,1095 975,1095 975,915 795,915
GND on Top Layer "GND_L01_P012" (solid, pour order 12): 1260,760 1535,760 1555,740 1555,600 1325,600 1310,585 1260,585
GND on Top Layer "GND_L01_P010" (solid, pour order 10): 870,700 675,700 675,565 870,565
GND on Bottom Layer "GND_L02_P024" (solid, remove dead copper, pour order 24): 0,3110.24 629.92,3110.24 629.92,2874.02 1417.32,2874.02 1417.32,3110.24 2362.2,3110.24 2362.2,0 0,0

## Silkscreen, mask and mechanical layers (free items; w line width, h text height)
Top Overlay:
  text "GNDs" at 1680,2880 h40
  text "SCL" at 1900,2720 h40
  text "SDA" at 2030,2720 h40
  text "5V" at 200,2675 h40
  text "GND" at 200,2575 h40
  text "21" at 1845,2530 h40
  text "2" at 1970,2530 h40
  text "1" at 2070,2530 h40
  text "V+" at 2150,2530 h40
  text "G" at 2265,2530 h40
  text "SC_RX" at 200,2476.66 h40
  text "4" at 458.34,2475 h40
  text "5" at 458.34,2380 h40
  text "SC_TX" at 200,2376.66 h40
  text "42" at 1840,2330 h40
  text "39" at 1940,2330 h40
  text "38" at 2045,2330 h40
  text "40" at 2140,2330 h40
  text "14" at 2245,2330 h40
  text "SC_PEN" at 200,2286.66 h40
  text "15" at 458.34,2285 h40
  text "RST" at 2185,2195 h40
  text "SC_DTR" at 200,2081.66 h40
  text "16" at 458.34,2080 h40
  text "DTR" at 2139,2046 h40 r90
  text "6" at 223.34,1930 h40
  text "A" at 300,1930 h40
  text "RST" at 2139,1921 h40 r90
  text "RX" at 2139,1836 h40 r90
  text "7" at 223.34,1835 h40
  text "A" at 300,1835 h40
  text "LED" at 1300,1750 h40
  text "17" at 223.34,1745 h40
  text "TX" at 2139,1741 h40 r90
  text "3V3 RX TX GND" at 605,1710 h40
  text "18" at 223.34,1642.29 h40
  text "GND" at 2139,1616 h40 r90
  text "5V" at 1340,1610 h40
  text "BOOT" at 2155,1560 h40
  text "8" at 223.34,1535 h40
  text "A" at 295,1535 h40
  text "+" at 60,1403.34 h40
  text "+" at 2305,1348.34 h40
  text "3V3" at 385,1290 h40 r270
  text "+" at 2310,728.34 h40
  text "<5V>" at 2280,715 h40 r90
  text "+ BATT -" at 485,60 h40
Board Shape:
  the board outline again, w20

## Text inside footprints (layer, text, board x,y; h text height)
U1: Mechanical 13 "ANTENNA" at 841.77,2965.87 h50